# Altium PCB Linux-Capable-Businnes-Card.PcbDoc (part 2 of 4)
Units mil, origin at the board's own origin, x right, y up, seen from the top; angles counter-clockwise.
Board outline 3385.83 x 2125.98 mil, 4 copper layers (L1 (TOP), L2 (GND), L3 (PWR), L4 (BOTTOM)), stack 38.228 mil thick; 154 components, 143 nets, 726 pads, 351 vias.
Unrouted connection lines stored in the file: 1.
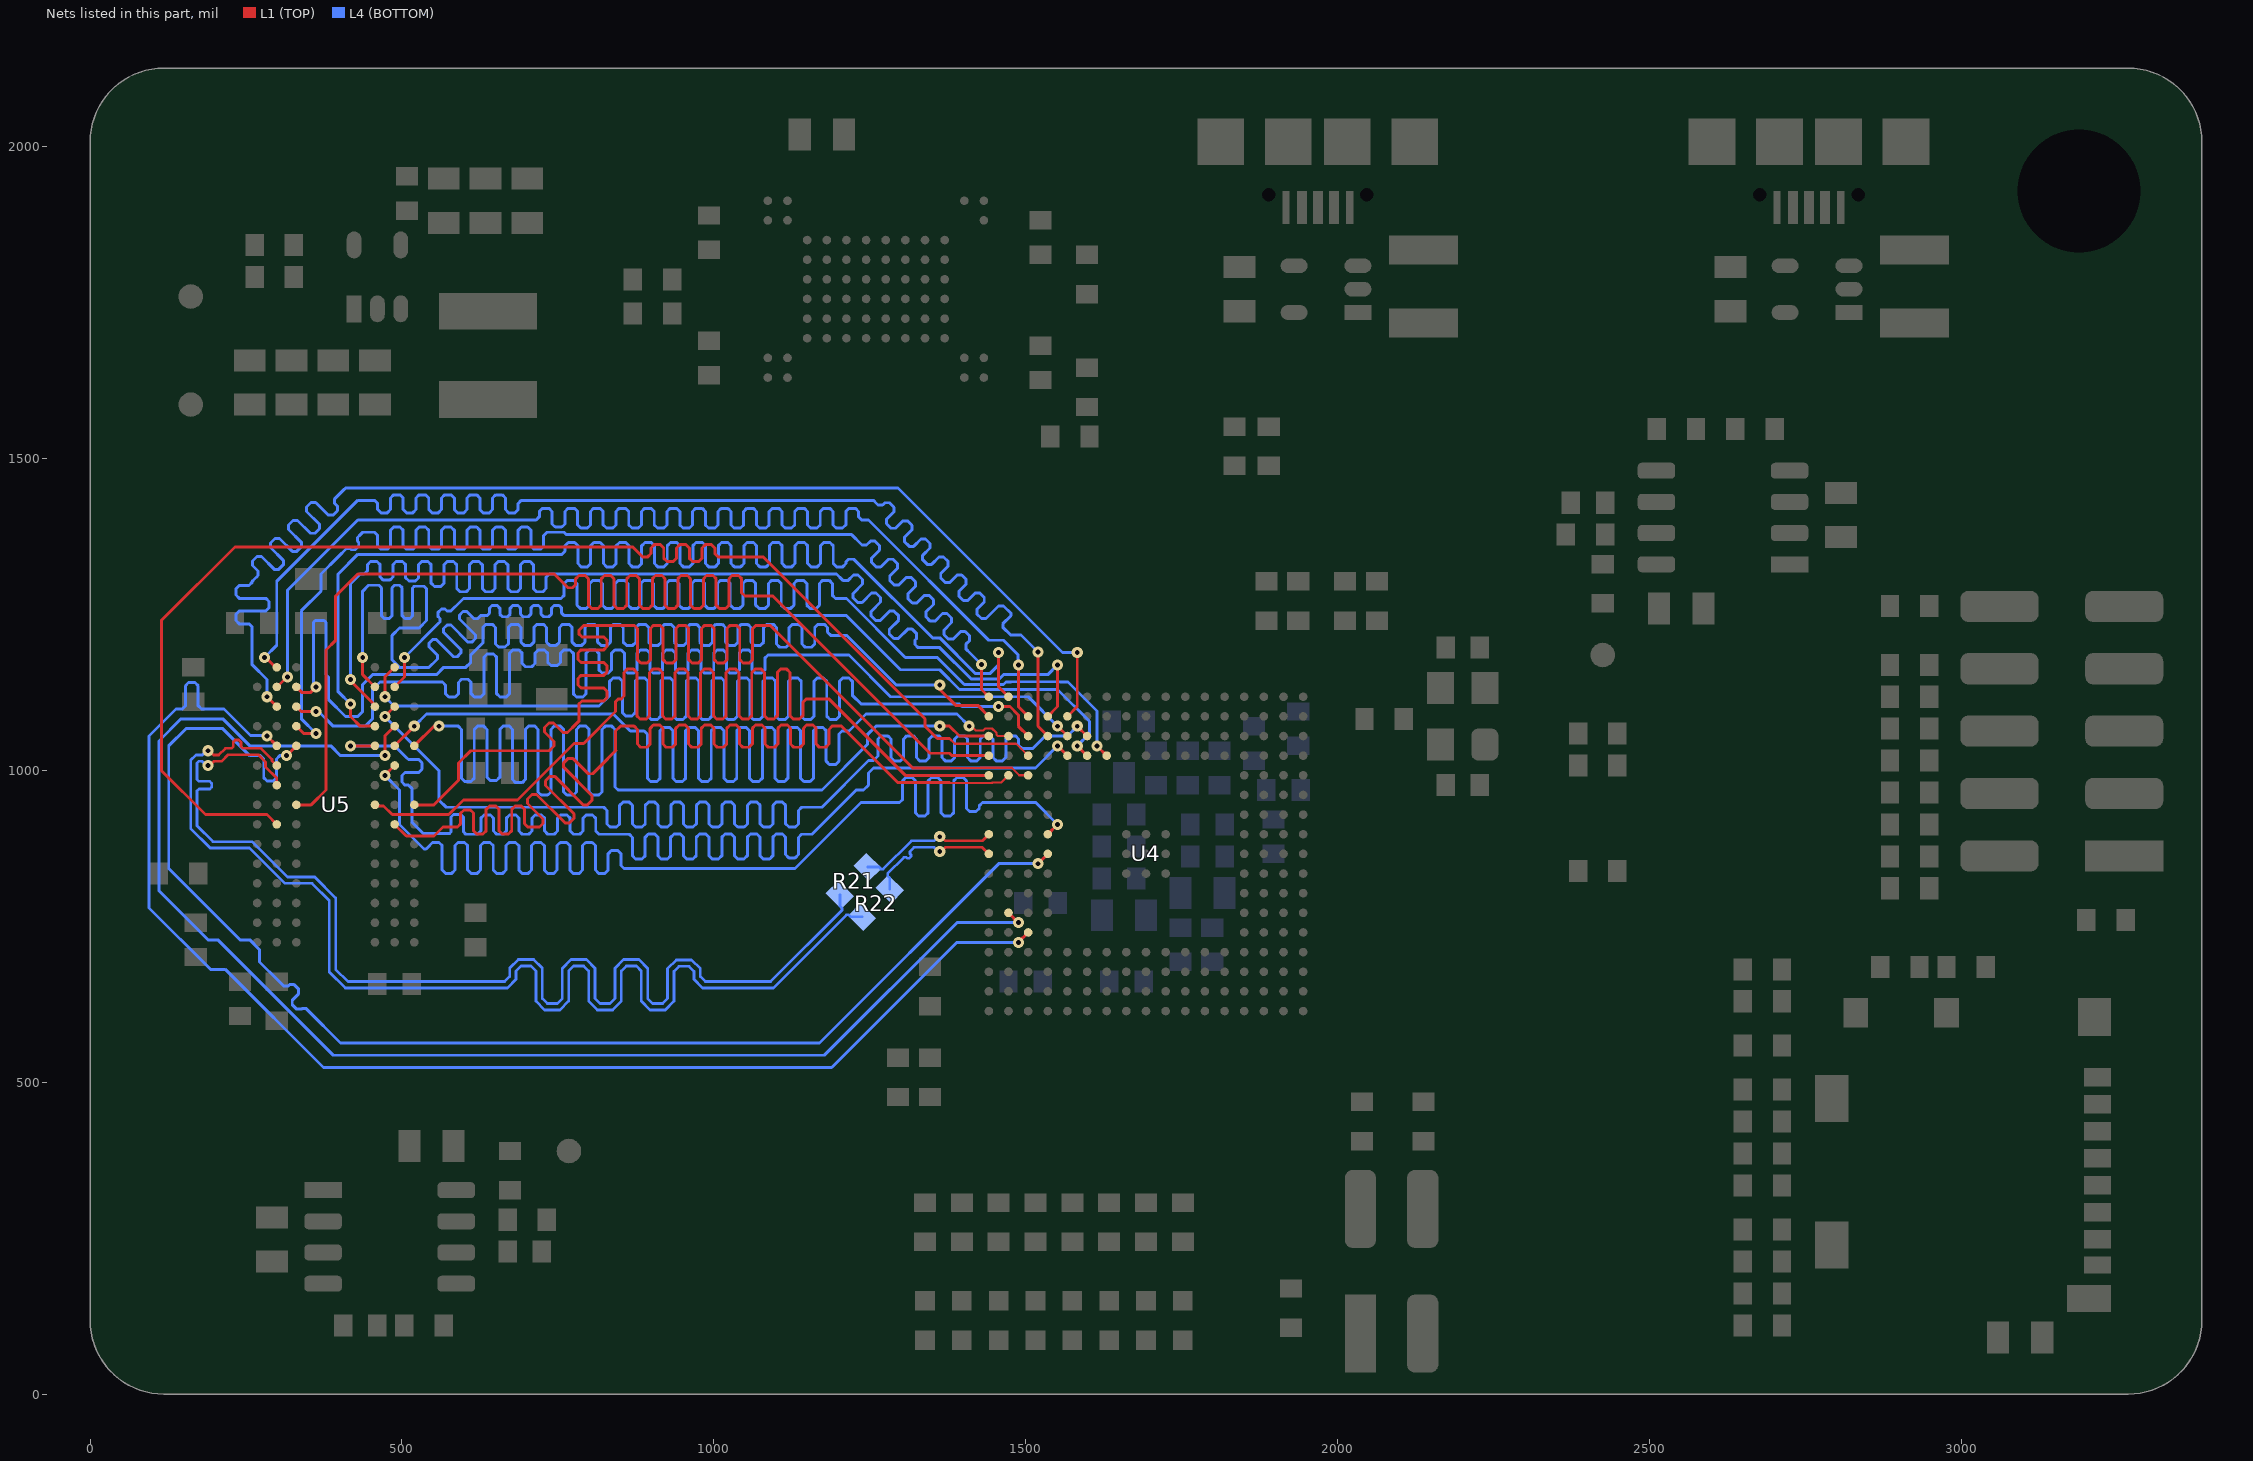
[diagram p4: the nets of this part, all layers, seen from the top]

## Via types
v1: diameter 17.72, hole 7.87, L1 (TOP) to L4 (BOTTOM), tented both sides, 280 vias
v2: diameter 25.59, hole 11.81, L1 (TOP) to L4 (BOTTOM), tented both sides, 71 vias

## Nets (pads, with @x,y where several pads share a name; then routed paths per layer and width w, separated by ;. In a path a pad name is that pad's centre, name@x,y a point inside that pad or via, vN(x,y) a via of type N, cw(c..) or ccw(c..) an arc to the next point about the centre after c; other vN are vias at no path point) (continued)
DRAM_A1: U4.B17 U5.M3 | length 2242.9
  L1 (TOP) w4.72: v1(417.32,1106.3) 417.32,1086.61 433.07,1070.87 U5.M3@456.69,1070.87 ; v1(1456.69,1188.98) 1456.69,1133.86 U4.B17@1472.44,1118.11
  L4 (BOTTOM) w4.72: v1(417.32,1106.3) 397.64,1125.98 397.64,1314.96 429.13,1346.46 754.05,1346.46 756.41,1346.46 761.53,1351.57 761.53,1360.18 766.65,1365.3 776.89,1365.3 782,1360.18 782,1331.57 787.12,1326.46 797.36,1326.46 802.48,1331.57 802.48,1360.18 807.59,1365.3 817.83,1365.3 822.95,1360.18 822.95,1331.57 828.07,1326.46 838.3,1326.46 843.42,1331.57 843.42,1360.18 848.54,1365.3 858.78,1365.3 863.89,1360.18 863.89,1331.57 869.01,1326.46 879.25,1326.46 884.37,1331.57 884.37,1360.18 889.48,1365.3 899.72,1365.3 904.84,1360.18 904.84,1331.57 909.96,1326.46 920.19,1326.46 925.31,1331.57 925.31,1360.18 930.43,1365.3 940.67,1365.3 945.78,1360.18 945.78,1331.57 950.9,1326.46 961.14,1326.46 966.26,1331.57 966.26,1360.18 971.37,1365.3 981.61,1365.3 986.73,1360.18 986.73,1331.57 991.85,1326.46 1002.08,1326.46 1007.2,1331.57 1007.2,1360.18 1012.32,1365.3 1022.56,1365.3 1027.67,1360.18 1027.67,1331.57 1032.79,1326.46 1043.03,1326.46 1048.15,1331.57 1048.15,1360.18 1053.26,1365.3 1063.5,1365.3 1068.62,1360.18 1068.62,1331.57 1073.74,1326.46 1083.97,1326.46 1089.09,1331.57 1089.09,1360.18 1094.21,1365.3 1104.44,1365.3 1109.56,1360.18 1109.56,1331.57 1114.68,1326.46 1124.92,1326.46 1130.04,1331.57 1130.04,1360.18 1135.15,1365.3 1145.39,1365.3 1150.51,1360.18 1150.51,1331.57 1155.63,1326.46 1165.86,1326.46 1170.98,1331.57 1170.98,1360.18 1176.1,1365.3 1186.33,1365.3 1191.45,1360.18 1191.45,1331.57 1196.57,1326.46 1206.81,1326.46 1211.92,1331.57 1211.92,1334.65 1215.86,1338.58 1224.41,1338.58 1350.39,1212.6 1362.2,1212.6 1419.69,1155.12 1442.52,1155.12 1456.69,1169.29 v1(1456.69,1188.98)
DRAM_A2: U4.A17 U5.M7 | length 2198.3
  L1 (TOP) w4.72: U5.M7@330.71,1070.87 342.52,1059.06 v1(362.2,1059.06) ; v1(1429.13,1169.88) 1429.13,1129.92 U4.A17@1440.94,1118.11
  L4 (BOTTOM) w4.72: v1(362.2,1059.06) 338.58,1082.68 338.58,1255.91 370.08,1287.4 370.08,1314.96 397.64,1342.52 411,1355.88 416.85,1355.88 418.93,1353.8 424.78,1353.8 430.63,1359.64 430.63,1365.49 428.54,1367.57 428.54,1373.42 433.07,1377.95 437.01,1381.89 455.91,1381.89 461.02,1376.77 461.02,1359.84 466.14,1354.72 476.38,1354.72 481.5,1359.84 481.5,1385.04 486.61,1390.16 496.85,1390.16 501.97,1385.04 501.97,1359.84 507.09,1354.72 517.32,1354.72 522.44,1359.84 522.44,1385.04 527.56,1390.16 537.8,1390.16 542.91,1385.04 542.91,1359.84 548.03,1354.72 558.27,1354.72 563.39,1359.84 563.39,1385.04 568.5,1390.16 578.74,1390.16 583.86,1385.04 583.86,1359.84 588.98,1354.72 599.21,1354.72 604.33,1359.84 604.33,1385.04 609.45,1390.16 619.69,1390.16 624.8,1385.04 624.8,1359.84 629.92,1354.72 640.16,1354.72 645.28,1359.84 645.28,1385.04 650.39,1390.16 660.63,1390.16 665.75,1385.04 665.75,1359.84 670.87,1354.72 681.1,1354.72 686.22,1359.84 686.22,1385.04 691.34,1390.16 701.57,1390.16 706.69,1385.04 706.69,1359.84 711.81,1354.72 722.05,1354.72 727.17,1359.84 727.17,1376.77 732.28,1381.89 743.55,1381.89 759.84,1381.89 763.78,1377.95 1221.06,1377.95 1235.94,1363.08 1237.61,1361.41 1244.85,1361.41 1250.98,1367.55 1258.22,1367.55 1265.46,1360.31 1265.46,1353.07 1253.06,1340.67 1253.06,1333.43 1260.3,1326.2 1267.54,1326.2 1279.94,1338.59 1287.17,1338.59 1294.41,1331.36 1294.41,1324.12 1282.01,1311.72 1282.01,1304.48 1289.25,1297.24 1296.49,1297.24 1308.89,1309.64 1316.13,1309.64 1323.36,1302.4 1323.36,1295.17 1310.97,1282.77 1310.97,1275.53 1318.2,1268.29 1325.44,1268.29 1337.84,1280.69 1345.08,1280.69 1352.32,1273.45 1352.32,1266.21 1339.92,1253.81 1339.92,1246.58 1347.16,1239.34 1354.4,1239.34 1366.79,1251.74 1374.03,1251.74 1381.27,1244.5 1381.27,1237.26 1368.87,1224.86 1368.87,1217.62 1376.11,1210.39 1383.35,1210.39 1395.75,1222.78 1402.98,1222.78 1410.22,1215.55 1410.22,1208.31 1404.08,1202.17 1404.08,1194.93 1411.71,1187.3 v1(1429.13,1169.88)
DRAM_A3: U4.F15 U5.N2 | length 2202.5
  L1 (TOP) w4.72: v1(472.44,1086.61) U5.N2@488.19,1102.36 ; v1(1582.68,1070.87) U4.F15@1598.42,1055.12
  L4 (BOTTOM) w4.72: v1(472.44,1086.61) 559.06,1000 559.06,952.76 570.87,940.94 800.66,940.94 823.49,940.94 828.61,935.83 828.61,914.25 833.73,909.13 843.96,909.13 849.08,914.25 849.08,944.02 854.2,949.13 864.44,949.13 869.55,944.02 869.55,914.25 874.67,909.13 884.91,909.13 890.03,914.25 890.03,944.02 895.14,949.13 905.38,949.13 910.5,944.02 910.5,914.25 915.62,909.13 925.85,909.13 930.97,914.25 930.97,944.02 936.09,949.13 946.32,949.13 951.44,944.02 951.44,914.25 956.56,909.13 966.8,909.13 971.92,914.25 971.92,944.02 977.03,949.13 987.27,949.13 992.39,944.02 992.39,914.25 997.51,909.13 1007.74,909.13 1012.86,914.25 1012.86,944.02 1017.98,949.13 1028.21,949.13 1033.33,944.02 1033.33,914.25 1038.45,909.13 1048.69,909.13 1053.8,914.25 1053.8,944.02 1058.92,949.13 1069.16,949.13 1074.28,944.02 1074.28,914.25 1079.4,909.13 1089.63,909.13 1094.75,914.25 1094.75,944.02 1099.87,949.13 1110.1,949.13 1115.22,944.02 1115.22,914.25 1120.34,909.13 1130.58,909.13 1135.69,914.25 1135.69,935.83 1140.81,940.94 1145.67,940.94 1173.23,940.94 1248.03,1015.75 1255.91,1015.75 1263.39,1023.23 1263.39,1050.32 1268.5,1055.43 1278.74,1055.43 1283.86,1050.32 1283.86,1020.55 1288.98,1015.43 1299.21,1015.43 1304.33,1020.55 1304.33,1050.32 1309.45,1055.43 1319.69,1055.43 1324.8,1050.32 1324.8,1020.55 1329.92,1015.43 1340.16,1015.43 1345.28,1020.55 1345.28,1050.32 1350.39,1055.43 1360.63,1055.43 1365.75,1050.32 1365.75,1020.55 1370.87,1015.43 1381.1,1015.43 1386.22,1020.55 1386.22,1050.32 1391.34,1055.43 1401.58,1055.43 1406.69,1050.32 1406.69,1020.55 1411.81,1015.43 1422.05,1015.43 1427.17,1020.55 1427.17,1050.32 1432.28,1055.43 1442.52,1055.43 1447.64,1050.32 1447.64,1020.55 1452.76,1015.43 1462.99,1015.43 1468.11,1020.55 1468.11,1050.32 1473.23,1055.43 1483.46,1055.43 1488.58,1050.32 1488.58,1040.55 1493.7,1035.43 1511.81,1035.43 1531.5,1055.12 1566.93,1055.12 v1(1582.68,1070.87)
DRAM_A4: U4.E16 U5.N8 | length 2213.4
  L1 (TOP) w4.72: v1(283.46,1118.11) U5.N8@299.21,1102.36 ; U4.E16@1566.93,1086.61 1582.68,1102.36 v1(1582.68,1188.98)
  L4 (BOTTOM) w4.72: v1(283.46,1118.11) 283.46,1145.67 259.84,1169.29 259.84,1227.56 259.84,1229.92 254.72,1235.04 239.05,1235.04 233.93,1240.16 233.93,1250.4 239.05,1255.51 281.57,1255.51 286.68,1260.63 286.68,1270.87 281.57,1275.99 239.05,1275.99 233.93,1281.1 233.93,1291.34 239.05,1296.46 254.72,1296.46 259.84,1301.58 259.84,1303.15 263.64,1306.94 267.38,1310.69 269.05,1312.36 269.05,1319.6 260.22,1328.43 260.22,1335.67 267.46,1342.91 274.7,1342.91 295.21,1322.39 302.45,1322.39 309.69,1329.63 309.69,1336.87 289.17,1357.38 289.17,1364.62 296.41,1371.86 303.65,1371.86 324.16,1351.35 331.4,1351.35 338.64,1358.58 338.64,1365.82 318.12,1386.33 318.12,1393.57 325.36,1400.81 332.6,1400.81 353.11,1380.3 360.35,1380.3 367.59,1387.54 367.59,1394.77 347.08,1415.29 347.08,1422.52 354.32,1429.76 361.55,1429.76 382.07,1409.25 389.3,1409.25 396.54,1416.49 396.54,1423.73 392.1,1428.17 392.1,1435.41 407.48,1450.79 409.45,1452.76 1295.28,1452.76 1559.06,1188.98 v1(1582.68,1188.98)
DRAM_A5: U4.D16 U5.N3 | length 2195.4
  L1 (TOP) w4.72: v1(417.32,1145.67) 417.32,1143.7 U5.N3@456.69,1104.33 ; U4.D16@1535.43,1086.61 1551.18,1102.36 v1(1551.18,1169.29)
  L4 (BOTTOM) w4.72: v1(417.32,1145.67) 417.32,1299.21 433.07,1314.96 437.01,1314.96 439.37,1314.96 444.49,1320.08 444.49,1329.84 449.61,1334.96 459.84,1334.96 464.96,1329.84 464.96,1310.09 470.08,1304.97 480.32,1304.97 485.43,1310.09 485.43,1329.84 490.55,1334.96 500.79,1334.96 505.91,1329.84 505.91,1308.66 511.02,1303.54 521.26,1303.54 526.38,1308.66 526.38,1329.84 531.5,1334.96 541.73,1334.96 546.85,1329.84 546.85,1299.98 551.97,1294.86 562.21,1294.86 567.32,1299.98 567.32,1329.84 572.44,1334.96 582.68,1334.96 587.8,1329.84 587.8,1291.57 592.91,1286.45 603.15,1286.45 608.27,1291.57 608.27,1329.84 613.39,1334.96 623.62,1334.96 628.74,1329.84 628.74,1291.57 633.86,1286.45 644.09,1286.45 649.21,1291.57 649.21,1329.84 654.33,1334.96 664.57,1334.96 669.69,1329.84 669.69,1291.57 674.8,1286.45 685.04,1286.45 690.16,1291.57 690.16,1329.84 695.28,1334.96 705.51,1334.96 710.63,1329.84 710.63,1291.57 715.75,1286.45 725.98,1286.45 731.1,1291.57 731.1,1309.84 736.22,1314.96 747.77,1314.96 1196.85,1314.96 1205.95,1305.87 1207.62,1304.19 1214.85,1304.19 1223.93,1313.27 1231.17,1313.27 1238.41,1306.04 1238.41,1298.8 1223.37,1283.75 1223.37,1276.52 1230.6,1269.28 1237.84,1269.28 1252.88,1284.32 1260.12,1284.32 1267.36,1277.08 1267.36,1269.84 1252.32,1254.8 1252.32,1247.56 1259.56,1240.33 1266.79,1240.33 1281.84,1255.37 1289.08,1255.37 1296.31,1248.13 1296.31,1240.89 1281.27,1225.85 1281.27,1218.61 1288.51,1211.37 1295.75,1211.37 1310.79,1226.42 1318.03,1226.42 1325.27,1219.18 1325.27,1211.94 1322.53,1209.21 1322.53,1201.97 1327.65,1196.85 1334.98,1196.85 1362.2,1196.85 1412.2,1146.85 1457.87,1146.85 1464.57,1153.54 1535.43,1153.54 v1(1551.18,1169.29)
DRAM_A6: U4.E15 U5.N7 | length 2258.2
  L1 (TOP) w4.72: U5.N7@330.71,1102.36 338.58,1094.49 v1(362.2,1094.49) ; v1(1551.18,1070.87) U4.E15@1566.93,1055.12
  L4 (BOTTOM) w4.72: v1(362.2,1094.49) 366.14,1094.49 389.76,1070.87 440.94,1070.87 452.76,1082.68 452.76,1129.92 464.57,1141.73 541.98,1141.73 564.81,1141.73 569.93,1136.61 569.93,1122.91 575.05,1117.8 585.29,1117.8 590.41,1122.91 590.41,1141.08 595.52,1146.2 605.76,1146.2 610.88,1141.08 610.88,1122.91 616,1117.8 626.23,1117.8 631.35,1122.91 631.35,1181.47 636.47,1186.59 646.7,1186.59 651.82,1181.47 651.82,1122.91 656.94,1117.8 667.18,1117.8 672.29,1122.91 672.29,1187.85 677.41,1192.97 687.65,1192.97 692.77,1187.85 692.77,1171.32 697.89,1166.21 708.12,1166.21 713.24,1171.32 713.24,1187.85 718.36,1192.97 728.59,1192.97 733.71,1187.85 733.71,1173.19 738.83,1168.07 749.07,1168.07 754.18,1173.19 754.18,1187.85 759.3,1192.97 769.54,1192.97 774.66,1187.85 774.66,1122.91 779.78,1117.8 790.01,1117.8 795.13,1122.91 795.13,1187.85 800.25,1192.97 810.48,1192.97 815.6,1187.85 815.6,1161.32 820.72,1156.2 830.96,1156.2 836.07,1161.32 836.07,1187.85 841.19,1192.97 851.43,1192.97 856.55,1187.85 856.55,1161.32 861.66,1156.2 871.9,1156.2 877.02,1161.32 877.02,1187.85 882.14,1192.97 892.37,1192.97 897.49,1187.85 897.49,1161.32 902.61,1156.2 912.85,1156.2 917.96,1161.32 917.96,1187.85 923.08,1192.97 933.32,1192.97 938.44,1187.85 938.44,1161.32 943.55,1156.2 953.79,1156.2 958.91,1161.32 958.91,1187.85 964.03,1192.97 974.26,1192.97 979.38,1187.85 979.38,1161.32 984.5,1156.2 994.74,1156.2 999.85,1161.32 999.85,1187.85 1004.97,1192.97 1015.21,1192.97 1020.33,1187.85 1020.33,1161.32 1025.44,1156.2 1035.68,1156.2 1040.8,1161.32 1040.8,1187.85 1045.92,1192.97 1056.15,1192.97 1061.27,1187.85 1061.27,1161.32 1066.39,1156.2 1076.62,1156.2 1081.74,1161.32 1081.74,1179.92 1086.86,1185.04 1111.06,1185.04 1216.54,1185.04 1283.46,1118.11 1503.94,1118.11 v1(1551.18,1070.87)
DRAM_A7: U4.G14 U5.P2 | length 2197.7
  L1 (TOP) w4.72: U5.P2@488.19,1133.86 503.94,1149.61 v1(503.94,1181.1) ; v1@1616.14,1037.4 U4.G14@1629.92,1023.62
  L4 (BOTTOM) w4.72: v1(503.94,1181.1) 559.06,1236.22 560.73,1237.89 560.73,1243.74 557.42,1247.04 557.42,1252.89 563.27,1258.73 569.12,1258.73 572.42,1255.43 578.26,1255.43 594.49,1271.65 598.43,1275.59 752.59,1275.59 754.95,1275.59 760.07,1280.71 760.07,1299.65 765.18,1304.77 775.42,1304.77 780.54,1299.65 780.54,1264.97 785.66,1259.86 795.89,1259.86 801.01,1264.97 801.01,1299.65 806.13,1304.77 816.37,1304.77 821.48,1299.65 821.48,1264.97 826.6,1259.86 836.84,1259.86 841.96,1264.97 841.96,1299.65 847.07,1304.77 857.31,1304.77 862.43,1299.65 862.43,1264.97 867.55,1259.86 877.78,1259.86 882.9,1264.97 882.9,1299.65 888.02,1304.77 898.26,1304.77 903.37,1299.65 903.37,1264.97 908.49,1259.86 918.73,1259.86 923.85,1264.97 923.85,1299.65 928.96,1304.77 939.2,1304.77 944.32,1299.65 944.32,1264.97 949.44,1259.86 959.67,1259.86 964.79,1264.97 964.79,1299.65 969.91,1304.77 980.15,1304.77 985.26,1299.65 985.26,1264.97 990.38,1259.86 1000.62,1259.86 1005.74,1264.97 1005.74,1299.65 1010.85,1304.77 1021.09,1304.77 1026.21,1299.65 1026.21,1264.97 1031.33,1259.86 1041.56,1259.86 1046.68,1264.97 1046.68,1299.65 1051.8,1304.77 1062.03,1304.77 1067.15,1299.65 1067.15,1264.97 1072.27,1259.86 1082.51,1259.86 1087.63,1264.97 1087.63,1299.65 1092.74,1304.77 1102.98,1304.77 1108.1,1299.65 1108.1,1264.97 1113.22,1259.86 1123.45,1259.86 1128.57,1264.97 1128.57,1299.65 1133.69,1304.77 1143.92,1304.77 1149.04,1299.65 1149.04,1264.97 1154.16,1259.86 1164.4,1259.86 1169.51,1264.97 1169.51,1299.65 1174.63,1304.77 1184.87,1304.77 1189.99,1299.65 1189.99,1280.71 1195.11,1275.59 1199.24,1275.59 1212.6,1275.59 1307.09,1181.1 1358.27,1181.1 1401.57,1137.8 1464.57,1137.8 1468.5,1141.73 1476.5,1141.73 1476.89,1142.13 1554.61,1142.13 1555,1141.73 1567.72,1141.73 1614.17,1095.28 v1(1614.17,1039.37)
DRAM_A8: U4.C16 U5.P8 | length 2213.3
  L1 (TOP) w4.72: U5.P8@299.8,1133.86 315.55,1149.61 v1(316.13,1149.61) ; v1(1488.19,1169.29) 1488.19,1102.36 U4.C16@1503.94,1086.61
  L4 (BOTTOM) w4.72: v1(316.13,1149.61) 316.13,1288.57 429.13,1401.57 712.77,1401.57 715.13,1401.57 720.25,1406.69 720.25,1415.12 725.36,1420.24 735.6,1420.24 740.72,1415.12 740.72,1395.28 745.84,1390.16 756.07,1390.16 761.19,1395.28 761.19,1415.12 766.31,1420.24 776.55,1420.24 781.66,1415.12 781.66,1393.7 786.78,1388.58 797.02,1388.58 802.14,1393.7 802.14,1415.12 807.25,1420.24 817.49,1420.24 822.61,1415.12 822.61,1393.7 827.73,1388.58 837.96,1388.58 843.08,1393.7 843.08,1415.12 848.2,1420.24 858.43,1420.24 863.55,1415.12 863.55,1393.7 868.67,1388.58 878.91,1388.58 884.03,1393.7 884.03,1415.12 889.14,1420.24 899.38,1420.24 904.5,1415.12 904.5,1393.7 909.62,1388.58 919.85,1388.58 924.97,1393.7 924.97,1415.12 930.09,1420.24 940.32,1420.24 945.44,1415.12 945.44,1393.7 950.56,1388.58 960.8,1388.58 965.91,1393.7 965.91,1415.12 971.03,1420.24 981.27,1420.24 986.39,1415.12 986.39,1393.7 991.51,1388.58 1001.74,1388.58 1006.86,1393.7 1006.86,1415.12 1011.98,1420.24 1022.21,1420.24 1027.33,1415.12 1027.33,1393.7 1032.45,1388.58 1042.69,1388.58 1047.8,1393.7 1047.8,1415.12 1052.92,1420.24 1063.16,1420.24 1068.28,1415.12 1068.28,1393.7 1073.39,1388.58 1083.63,1388.58 1088.75,1393.7 1088.75,1415.12 1093.87,1420.24 1104.1,1420.24 1109.22,1415.12 1109.22,1393.7 1114.34,1388.58 1124.58,1388.58 1129.69,1393.7 1129.69,1415.12 1134.81,1420.24 1145.05,1420.24 1150.17,1415.12 1150.17,1393.7 1155.28,1388.58 1165.52,1388.58 1170.64,1393.7 1170.64,1415.12 1175.76,1420.24 1185.99,1420.24 1191.11,1415.12 1191.11,1393.7 1196.23,1388.58 1206.47,1388.58 1211.58,1393.7 1211.58,1415.12 1216.7,1420.24 1226.94,1420.24 1232.06,1415.12 1232.06,1406.69 1237.17,1401.57 1248.03,1401.57 1440.94,1208.66 1464.57,1208.66 1487.99,1185.24 1487.99,1169.49 v1(1488.19,1169.29)
DRAM_A9: U4.F14 U5.P3 | length 2224.7
  L1 (TOP) w4.72: v1(437.01,1181.1) 437.01,1153.54 U5.P3@456.69,1133.86 ; v1(1582.68,1039.37) U4.F14@1598.42,1023.62
  L4 (BOTTOM) w4.72: v1(437.01,1181.1) 437.01,1287.4 446.51,1296.9 463.14,1296.9 467.27,1292.77 467.27,1247.91 471.4,1243.78 479.67,1243.78 483.81,1247.91 483.81,1292.77 487.94,1296.9 496.21,1296.9 500.34,1292.77 500.34,1247.91 504.48,1243.78 512.74,1243.78 516.88,1247.91 516.88,1292.47 519.69,1295.28 535.43,1295.28 539.37,1291.34 539.37,1240.16 527.56,1228.35 496.06,1228.35 484.25,1216.54 484.25,1177.17 496.06,1165.35 543.31,1165.35 555.12,1177.17 556.79,1178.84 556.79,1184.68 543.34,1198.13 543.34,1203.98 549.19,1209.82 555.03,1209.82 582.62,1182.23 588.47,1182.23 594.32,1188.08 594.32,1193.92 566.72,1221.52 566.72,1227.36 572.57,1233.21 578.42,1233.21 606.01,1205.62 611.85,1205.62 617.7,1211.46 617.7,1217.31 592.11,1242.9 592.11,1248.74 597.96,1254.59 603.8,1254.59 615.25,1243.14 621.1,1243.14 625.79,1247.83 625.98,1248.03 633.86,1248.03 636.22,1248.03 640.35,1252.17 640.35,1260.09 644.49,1264.23 652.76,1264.23 656.89,1260.09 656.89,1250.49 661.02,1246.36 669.29,1246.36 673.43,1250.49 673.43,1260.09 677.56,1264.23 685.83,1264.23 689.96,1260.09 689.96,1250.49 694.09,1246.36 702.36,1246.36 706.5,1250.49 706.5,1260.09 710.63,1264.23 718.9,1264.23 723.03,1260.09 723.03,1250.49 727.17,1246.36 735.43,1246.36 739.57,1250.49 739.57,1260.09 743.7,1264.23 751.97,1264.23 756.1,1260.09 756.1,1252.17 760.24,1248.03 768.19,1248.03 1212.6,1248.03 1299.21,1161.42 1362.2,1161.42 1393.7,1129.92 1397.76,1129.92 1398.15,1129.53 1475.98,1129.53 1476.38,1129.92 1551.18,1129.92 1602.36,1078.74 1602.36,1059.06 v1(1582.68,1039.37)
DRAM_A10: U4.B6 U5.M2 | length 2292.8
  L1 (TOP) w4.72: v1(472.44,1023.62) 472.44,1055.12 U5.M2@488.19,1070.87 ; U4.B6@1472.44,771.65 v1(1488.19,755.9)
  L4 (BOTTOM) w4.72: v1(472.44,1023.62) 401.57,1023.62 385.83,1039.37 255.91,1039.37 212.6,1082.68 145.67,1082.68 110.24,1047.24 110.24,807.09 188.98,728.35 204.72,728.35 389.76,543.31 1177.17,543.31 1389.76,755.9 v1(1488.19,755.9)
DRAM_A11: U4.A16 U5.P7 | length 2275.6
  L1 (TOP) w4.72: U5.P7@330.71,1133.86 339.96,1124.61 352.95,1124.61 v1(362.2,1133.86) ; v1(1362.2,1136.81) 1362.2,1129.92 1387.8,1104.33 1423.23,1104.33 U4.A16@1440.94,1086.61
  L4 (BOTTOM) w4.72: v1(362.2,1133.86) 362.2,1137.37 358.27,1141.31 358.27,1237.39 361.04,1240.16 375.19,1240.16 377.95,1237.39 377.95,1153.54 381.89,1149.61 381.89,1114.17 409.45,1086.61 429.13,1086.61 437.01,1094.49 437.01,1137.8 452.76,1153.54 555.12,1153.54 566.93,1165.35 602.36,1165.35 610.24,1173.23 610.24,1185.04 629.53,1204.33 629.53,1229.08 634.65,1234.19 644.88,1234.19 650,1229.08 650,1202.84 655.12,1197.72 665.35,1197.72 670.47,1202.84 670.47,1229.08 675.59,1234.19 685.83,1234.19 690.95,1229.08 690.95,1205.67 696.06,1200.55 706.3,1200.55 711.42,1205.67 711.42,1229.08 716.54,1234.19 726.77,1234.19 731.89,1229.08 731.89,1205.67 737.01,1200.55 747.24,1200.55 752.36,1205.67 752.36,1229.08 757.48,1234.19 767.72,1234.19 772.83,1229.08 772.83,1205.67 777.95,1200.55 788.19,1200.55 793.31,1205.67 793.31,1229.08 798.43,1234.19 808.66,1234.19 813.78,1229.08 813.78,1205.67 818.9,1200.55 829.13,1200.55 834.25,1205.67 834.25,1229.08 839.37,1234.19 849.61,1234.19 854.72,1229.08 854.72,1205.67 859.84,1200.55 870.08,1200.55 875.2,1205.67 875.2,1229.08 880.32,1234.19 890.55,1234.19 895.67,1229.08 895.67,1205.67 900.79,1200.55 911.02,1200.55 916.14,1205.67 916.14,1229.08 921.26,1234.19 931.5,1234.19 936.61,1229.08 936.61,1205.67 941.73,1200.55 951.97,1200.55 957.09,1205.67 957.09,1229.08 962.2,1234.19 972.44,1234.19 977.56,1229.08 977.56,1205.67 982.68,1200.55 992.91,1200.55 998.03,1205.67 998.03,1229.08 1003.15,1234.19 1013.39,1234.19 1018.5,1229.08 1018.5,1205.67 1023.62,1200.55 1033.86,1200.55 1038.98,1205.67 1038.98,1229.08 1044.09,1234.19 1054.33,1234.19 1059.45,1229.08 1059.45,1205.67 1064.57,1200.55 1074.8,1200.55 1079.92,1205.67 1079.92,1229.08 1085.04,1234.19 1095.28,1234.19 1100.39,1229.08 1100.39,1202.63 1105.51,1197.52 1115.75,1197.52 1120.87,1202.63 1120.87,1229.08 1125.98,1234.19 1136.22,1234.19 1141.34,1229.08 1141.34,1202.63 1146.46,1197.52 1156.69,1197.52 1161.81,1202.63 1161.81,1229.08 1166.93,1234.19 1177.16,1234.19 1182.28,1229.08 1182.28,1221.65 1187.4,1216.54 1212.72,1216.54 1292.44,1136.81 v1(1362.2,1136.81)
DRAM_A12: U4.C15 U5.R2 | length 2264.7
  L1 (TOP) w4.72: v1(472.44,1118.11) 472.44,1149.61 U5.R2@488.19,1165.35 ; v1(1456.69,1102.36) 1474.79,1102.36 1488.19,1088.96 1488.19,1070.87 U4.C15@1503.94,1055.12
  L4 (BOTTOM) w4.72: v1(472.44,1118.11) 487.2,1103.35 815.94,1103.35 833.03,1120.43 833.03,1143.08 838.15,1148.2 848.38,1148.2 853.5,1143.08 853.5,1092.44 858.62,1087.33 868.86,1087.33 873.97,1092.44 873.97,1143.08 879.09,1148.2 889.33,1148.2 894.45,1143.08 894.45,1086.74 899.56,1081.62 909.8,1081.62 914.92,1086.74 914.92,1143.08 920.04,1148.2 930.27,1148.2 935.39,1143.08 935.39,1086.74 940.51,1081.62 950.74,1081.62 955.86,1086.74 955.86,1143.08 960.98,1148.2 971.22,1148.2 976.34,1143.08 976.34,1086.74 981.45,1081.62 991.69,1081.62 996.81,1086.74 996.81,1143.08 1001.93,1148.2 1012.16,1148.2 1017.28,1143.08 1017.28,1086.74 1022.4,1081.62 1032.63,1081.62 1037.75,1086.74 1037.75,1143.08 1042.87,1148.2 1053.11,1148.2 1058.23,1143.08 1058.23,1086.74 1063.34,1081.62 1073.58,1081.62 1078.7,1086.74 1078.7,1143.08 1083.82,1148.2 1094.05,1148.2 1099.17,1143.08 1099.17,1086.74 1104.29,1081.62 1114.52,1081.62 1119.64,1086.74 1119.64,1143.08 1124.76,1148.2 1135,1148.2 1140.11,1143.08 1140.11,1086.74 1145.23,1081.62 1155.47,1081.62 1160.59,1086.74 1160.59,1143.08 1165.71,1148.2 1175.94,1148.2 1181.06,1143.08 1181.06,1086.74 1186.18,1081.62 1196.41,1081.62 1201.53,1086.74 1201.53,1143.08 1206.65,1148.2 1216.89,1148.2 1222,1143.08 1222,1120.52 1236.22,1106.3 1393.7,1106.3 1397.64,1102.36 1421.26,1102.36 v1(1456.69,1102.36)
DRAM_A13: U4.D15 U5.R8 | length 2223.1
  L1 (TOP) w4.72: v1(279.53,1181.1) 281.5,1181.1 297.24,1165.35 U5.R8@299.21,1165.35 ; v1(1519.69,1189.96) 1519.69,1070.87 U4.D15@1535.43,1055.12
  L4 (BOTTOM) w4.72: v1(279.53,1181.1) 299.21,1200.79 299.21,1303.15 429.13,1433.07 455.91,1433.07 461.02,1427.95 461.02,1418.19 466.14,1413.07 476.38,1413.07 481.5,1418.19 481.5,1436.82 486.61,1441.94 496.85,1441.94 501.97,1436.82 501.97,1418.19 507.09,1413.07 517.32,1413.07 522.44,1418.19 522.44,1436.82 527.56,1441.94 537.8,1441.94 542.91,1436.82 542.91,1418.19 548.03,1413.07 558.27,1413.07 563.39,1418.19 563.39,1436.82 568.5,1441.94 578.74,1441.94 583.86,1436.82 583.86,1418.19 588.98,1413.07 599.21,1413.07 604.33,1418.19 604.33,1436.82 609.45,1441.94 619.69,1441.94 624.8,1436.82 624.8,1418.19 629.92,1413.07 640.16,1413.07 645.28,1418.19 645.28,1436.82 650.39,1441.94 660.63,1441.94 665.75,1436.82 665.75,1418.19 670.87,1413.07 681.1,1413.07 686.22,1418.19 686.22,1427.95 691.34,1433.07 1255.91,1433.07 1261.81,1427.17 1263.48,1425.49 1270.72,1425.49 1274.34,1429.12 1281.58,1429.12 1288.82,1421.88 1288.82,1414.64 1276.96,1402.78 1276.96,1395.54 1284.2,1388.31 1291.44,1388.31 1303.3,1400.17 1310.53,1400.17 1317.77,1392.93 1317.77,1385.69 1305.91,1373.83 1305.91,1366.59 1313.15,1359.35 1320.39,1359.35 1332.25,1371.21 1339.49,1371.21 1346.72,1363.98 1346.72,1356.74 1334.86,1344.88 1334.86,1337.64 1342.1,1330.4 1349.34,1330.4 1361.2,1342.26 1368.44,1342.26 1375.68,1335.02 1375.68,1327.79 1363.82,1315.92 1363.82,1308.69 1371.05,1301.45 1378.29,1301.45 1390.15,1313.31 1397.39,1313.31 1404.63,1306.07 1404.63,1298.83 1392.77,1286.97 1392.77,1279.73 1400.01,1272.5 1407.24,1272.5 1419.11,1284.36 1426.34,1284.36 1433.58,1277.12 1433.58,1269.88 1421.72,1258.02 1421.72,1250.78 1428.96,1243.54 1436.2,1243.54 1456.43,1263.78 1464.57,1263.78 1476.39,1251.96 1476.39,1248.04 1463.37,1235.03 1463.37,1229.54 1475.89,1217.03 1492.62,1217.03 v1(1519.69,1189.96)
DRAM_BA0: U4.B15 U5.L2 | length 2269
  L1 (TOP) w3.54: v1(1409.45,1070.87) 1413.28,1070.87 1420.37,1063.78 1431.41,1063.78 1434.96,1067.32 1446,1067.32 1453.15,1060.17 1453.15,1057.19 1455.22,1055.12 U4.B15@1472.44,1055.12
  L1 (TOP) w4.72: U5.L2@488.19,1039.37 v1(519.69,1070.87)
  L4 (BOTTOM) w4.72: v1(519.69,1070.87) 539.37,1090.55 838.58,1090.55 858.27,1070.87 866.14,1062.99 888.34,1063.01 893.46,1057.9 893.46,987.47 898.58,982.35 908.81,982.35 913.93,987.47 913.93,1063.69 919.05,1068.8 929.29,1068.8 934.4,1063.69 934.4,987.47 939.52,982.35 949.76,982.35 954.88,987.47 954.88,1063.69 959.99,1068.8 970.23,1068.8 975.35,1063.69 975.35,987.47 980.47,982.35 990.7,982.35 995.82,987.47 995.82,1063.69 1000.94,1068.8 1011.18,1068.8 1016.29,1063.69 1016.29,987.47 1021.41,982.35 1031.65,982.35 1036.77,987.47 1036.77,1063.69 1041.88,1068.8 1052.12,1068.8 1057.24,1063.69 1057.24,987.47 1062.36,982.35 1072.59,982.35 1077.71,987.47 1077.71,1063.69 1082.83,1068.8 1093.06,1068.8 1098.18,1063.69 1098.18,987.47 1103.3,982.35 1113.54,982.35 1118.66,987.47 1118.66,1063.69 1123.77,1068.8 1134.01,1068.8 1139.13,1063.69 1139.13,987.47 1144.25,982.35 1154.48,982.35 1159.6,987.47 1159.6,1063.69 1164.72,1068.8 1174.95,1068.8 1180.07,1063.69 1180.07,1014.74 1185.19,1009.63 1195.43,1009.63 1200.54,1014.74 1200.54,1058.22 1205.66,1063.34 1214.53,1063.35 1216.89,1063.35 1244.09,1090.55 1389.76,1090.55 v1(1409.45,1070.87)
DRAM_BA1: U4.E14 U5.L3 | length 2205
  L1 (TOP) w4.72: v1(417.32,1039.37) U5.L3@456.69,1039.37 ; v1(1551.18,1039.37) U4.E14@1566.93,1023.62
  L4 (BOTTOM) w4.72: v1(417.32,1039.37) 488.19,1039.37 507.87,1019.69 510.24,1017.32 526.94,1017.32 532.06,1012.2 532.06,1001.97 526.94,996.85 505,996.85 499.88,991.73 499.88,981.5 505,976.38 510.63,976.38 515.75,971.26 515.75,964.57 515.75,917.32 534.45,898.62 575.97,898.62 578.74,901.39 578.74,925.2 582.68,929.13 594.49,929.13 598.43,925.2 598.43,901.57 602.36,897.64 621.26,897.64 626.38,902.76 626.38,923.3 631.5,928.42 641.73,928.42 646.85,923.3 646.85,902.75 651.97,897.63 662.2,897.63 667.32,902.75 667.32,923.3 672.44,928.42 682.68,928.42 687.8,923.3 687.8,902.75 692.91,897.63 703.15,897.63 708.27,902.75 708.27,923.3 713.39,928.42 723.62,928.42 728.74,923.3 728.74,902.75 733.86,897.63 744.09,897.63 749.21,902.75 749.21,923.3 754.33,928.42 764.57,928.42 769.68,923.3 769.68,902.75 774.8,897.63 785.04,897.63 790.16,902.75 790.16,923.3 795.28,928.42 805.51,928.42 810.63,923.3 810.63,902.76 815.75,897.64 841.47,897.64 864.3,897.64 869.42,892.52 869.42,863.07 874.54,857.95 884.78,857.95 889.9,863.07 889.9,892.83 895.01,897.95 905.25,897.95 910.37,892.83 910.37,863.07 915.49,857.95 925.72,857.95 930.84,863.07 930.84,892.83 935.96,897.95 946.19,897.95 951.31,892.83 951.31,863.07 956.43,857.95 966.67,857.95 971.78,863.07 971.78,892.83 976.9,897.95 987.14,897.95 992.26,892.83 992.26,863.07 997.38,857.95 1007.61,857.95 1012.73,863.07 1012.73,892.83 1017.85,897.95 1028.08,897.95 1033.2,892.83 1033.2,863.07 1038.32,857.95 1048.56,857.95 1053.67,863.07 1053.67,892.83 1058.79,897.95 1069.03,897.95 1074.15,892.83 1074.15,863.07 1079.27,857.95 1089.5,857.95 1094.62,863.07 1094.62,892.83 1099.74,897.95 1109.97,897.95 1115.09,892.83 1115.09,864.97 1120.21,859.85 1130.45,859.85 1135.56,864.97 1135.56,892.52 1140.68,897.64 1153.54,897.64 1157.48,897.64 1228.35,968.5 1240.16,968.5 1248.03,976.38 1248.03,996.06 1255.91,1003.94 1515.75,1003.94 v1(1551.18,1039.37)
DRAM_BA2: U4.A15 U5.L1 | length 2211.8
  L1 (TOP) w4.72: U5.L1@519.69,1039.37 551.18,1070.87 v1(559.06,1070.87) ; v1(1362.2,1070.87) 1377.95,1070.87 1393.7,1055.12 U4.A15@1440.94,1055.12
  L4 (BOTTOM) w4.72: v1(559.06,1070.87) 567.45,1070.87 590.28,1070.87 595.4,1065.75 595.4,987.34 600.52,982.23 610.76,982.23 615.87,987.34 615.87,1065.75 620.99,1070.87 631.23,1070.87 636.35,1065.75 636.35,988.92 641.46,983.8 651.7,983.8 656.82,988.92 656.82,1065.75 661.94,1070.87 672.17,1070.87 677.29,1065.75 677.29,985.52 682.41,980.4 692.65,980.4 697.76,985.52 697.76,1065.75 702.88,1070.87 713.12,1070.87 718.24,1065.75 718.24,965.55 723.35,960.43 733.59,960.43 738.71,965.55 738.71,1065.75 743.83,1070.87 754.06,1070.87 759.18,1065.75 759.18,965.55 764.3,960.43 774.53,960.43 779.65,965.55 779.65,1065.75 784.77,1070.87 795.01,1070.87 800.13,1065.75 800.13,965.55 805.24,960.43 815.48,960.43 820.6,965.55 820.6,1065.75 825.72,1070.87 832.06,1070.87 836.38,1070.87 841.49,1065.75 841.49,973.61 846.61,968.49 1173.21,968.49 1246.06,1041.34 1246.06,1057.09 1259.84,1070.87 v1(1362.2,1070.87)
DRAM_CAS: U4.D9 U5.L7 | length 2200.5
  L1 (TOP) w4.72: v1(314.96,1023.62) U5.L7@330.71,1039.37 ; v1(1519.68,850.39) U4.D9@1535.43,866.14
  L4 (BOTTOM) w4.72: v1(314.96,1023.62) 311.77,1023.62 303.96,1023.62 298.84,1018.5 298.84,988.23 293.72,983.12 283.49,983.12 278.37,988.23 278.37,1018.5 273.25,1023.62 256.02,1023.62 243.18,1036.47 212.72,1066.93 153.54,1066.93 125.98,1039.37 125.98,842.52 240.16,728.35 255.91,728.35 271.65,712.6 271.65,692.91 301.18,663.39 310.38,654.18 317.62,654.18 319.92,656.48 327.15,656.48 334.39,649.24 334.39,642 324.06,631.67 324.06,624.43 331.3,617.19 338.54,617.19 339.34,617.99 346.57,617.99 348.25,616.32 401.57,562.99 1169.29,562.99 1456.69,850.39 v1(1519.68,850.39)
DRAM_CKE: U4.D10 U5.K2 | length 2200.5
  L1 (TOP) w4.72: v1(472.44,992.12) U5.K2@488.19,1007.87 ; U4.D10@1535.43,897.64 v1(1551.18,913.38)
  L4 (BOTTOM) w4.72: v1(472.44,992.12) 496.06,968.5 496.06,913.39 535.43,874.02 536.47,874.02 538.83,874.02 543.95,879.13 543.95,879.48 549.07,884.6 559.3,884.6 564.42,879.48 564.42,840.16 569.54,835.04 579.78,835.04 584.89,840.16 584.89,879.48 590.01,884.6 600.25,884.6 605.37,879.48 605.37,840.16 610.48,835.04 620.72,835.04 625.84,840.16 625.84,879.48 630.96,884.6 641.19,884.6 646.31,879.48 646.31,840.16 651.43,835.04 661.67,835.04 666.78,840.16 666.78,879.48 671.9,884.6 682.14,884.6 687.26,879.48 687.26,840.16 692.37,835.04 702.61,835.04 707.73,840.16 707.73,879.48 712.85,884.6 723.08,884.6 728.2,879.48 728.2,840.16 733.32,835.04 743.56,835.04 748.67,840.16 748.67,879.48 753.79,884.6 764.03,884.6 769.15,879.48 769.15,840.16 774.26,835.04 784.5,835.04 789.62,840.16 789.62,879.48 794.74,884.6 804.97,884.6 810.09,879.48 810.09,840.16 815.21,835.04 825.45,835.04 830.56,840.16 830.56,866.56 835.68,871.68 845.92,871.68 851.04,866.56 851.04,847.64 856.15,842.52 865.65,842.52 865.73,842.52 1129.92,842.52 1235.84,948.44 1295.28,948.44 1297.64,948.44 1302.76,953.56 1302.76,983.32 1307.87,988.44 1318.11,988.44 1323.23,983.32 1323.23,932.07 1328.35,926.95 1338.58,926.95 1343.7,932.07 1343.7,983.32 1348.82,988.44 1359.06,988.44 1364.17,983.32 1364.17,932.07 1369.29,926.95 1379.53,926.95 1384.65,932.07 1384.65,983.32 1389.76,988.44 1400,988.44 1405.12,983.32 1405.12,939.09 1410.24,933.97 1420.47,933.97 1425.59,939.09 1425.59,943.32 1430.71,948.44 1447.71,948.44 1516.12,948.44 v1(1551.18,913.38)
DRAM_CLK_N: R22.1 U4.A9 | length 224.3
  L1 (TOP) w4.33: v1(1362.2,870.08) 1364.78,870.08 1371.43,876.73 1389.76,876.73 1430.35,876.73 U4.A9@1440.94,866.14
  L4 (BOTTOM) w4.33: R22.1@1282.11,809.67 1282.11,827.49 1278.75,830.86 1278.75,834.44 1305,860.7 1308.59,860.7 1310.26,859.03 1313.19,859.03 1316.11,861.95 1316.11,864.87 1314.44,866.55 1314.44,870.14 1321.03,876.73 1352.97,876.73 1359.63,870.08 v1(1362.2,870.08)
DRAM_CLK_P: R21.1 U4.A10 | length 224.3
  L1 (TOP) w4.33: v1(1362.2,893.7) 1364.78,893.7 1371.43,887.05 1385.49,887.05 1430.35,887.05 U4.A10@1440.94,897.64
  L4 (BOTTOM) w4.33: R21.1@1246.68,845.11 1264.5,845.11 1267.86,841.74 1271.45,841.74 1316.76,887.05 1352.97,887.05 1359.63,893.7 v1(1362.2,893.7)
DRAM_CLK_R_N: R22.2 U5.K8 | length 1981.7
  L1 (TOP) w4.33: v1(188.98,1031.5) 191.63,1031.5 198.07,1025.06 ; 198.21,1024.84 206.08,1024.84 216.67,1035.43 224.41,1035.43 226.58,1035.43 229.63,1038.48 229.63,1045.65 232.68,1048.7 238.78,1048.7 241.83,1045.65 241.83,1038.48 244.88,1035.43 248.03,1035.43 273.95,1035.43 291.61,1017.77 291.61,1015.14 U5.K8@298.88,1007.87
  L4 (BOTTOM) w4.33: v1(188.98,1031.5) 186.4,1031.5 179.75,1024.84 169.64,1024.84 161.06,1016.26 161.06,907.03 192.58,875.51 255.57,875.51 312.18,818.9 355.83,818.9 383.39,791.34 383.39,681.1 383.39,676.83 409.11,651.1 659.44,651.1 668.9,651.1 682.91,665.12 682.91,678.5 690.89,686.47 706.83,686.47 714.8,678.5 714.8,630 728.82,615.98 753.31,615.98 767.32,630 767.32,678.5 775.3,686.47 791.24,686.47 799.21,678.5 799.21,630 813.23,615.98 837.72,615.98 851.73,630 851.73,678.5 859.7,686.47 875.65,686.47 883.62,678.5 883.62,630 897.64,615.98 922.13,615.98 936.14,630 936.14,677.89 944.11,685.86 960.06,685.86 968.03,677.89 968.03,665.12 982.05,651.1 1001.96,651.1 1095.4,651.1 1212.8,768.5 1216.39,768.5 1219.75,765.13 R22.2@1237.57,765.13
DRAM_CLK_R_P: R21.2 U5.J8 | length 1978.5
  L1 (TOP) w4.33: v1(188.98,1007.87) 191.55,1007.87 198.21,1014.53 210.36,1014.53 220.95,1025.12 269.68,1025.12 281.3,1013.5 281.3,1005.51 299.21,987.6 U5.J8@299.21,976.38
  L4 (BOTTOM) w4.33: v1(188.98,1007.87) 186.4,1007.87 179.75,1014.53 173.92,1014.53 171.38,1011.99 171.38,992.13 171.38,985.46 174.43,982.41 191.83,982.41 194.88,979.36 194.88,973.26 191.83,970.2 174.43,970.2 171.38,967.15 171.38,952.78 171.38,911.3 196.85,885.83 259.84,885.83 316.46,829.21 360.1,829.21 393.7,795.61 393.7,681.1 413.39,661.42 659.44,661.42 664.63,661.42 672.6,669.39 672.6,682.77 686.61,696.79 711.1,696.79 725.12,682.77 725.12,634.27 733.09,626.3 749.04,626.3 757.01,634.27 757.01,682.77 771.02,696.79 795.51,696.79 809.53,682.77 809.53,634.27 817.5,626.3 833.44,626.3 841.42,634.27 841.42,682.77 855.43,696.79 879.92,696.79 893.94,682.77 893.94,634.27 901.91,626.3 917.85,626.3 925.83,634.27 925.83,682.16 939.84,696.18 964.33,696.18 978.35,682.16 978.35,669.39 986.32,661.42 1001.96,661.42 1091.13,661.42 1205.51,775.79 1205.51,779.38 1202.14,782.75 R21.2@1202.14,800.56
DRAM_CS: U4.C5 U5.L8 | length 2200.5
  L1 (TOP) w4.72: v1(283.46,1055.12) U5.L8@299.21,1039.37 ; v1(1488.19,724.41) U4.C5@1503.94,740.16
  L4 (BOTTOM) w4.72: v1(283.46,1055.12) 282.68,1055.91 257.24,1055.91 214.72,1098.43 184.65,1098.43 178.35,1098.43 173.23,1103.54 173.23,1135.63 168.11,1140.75 157.87,1140.75 152.76,1135.63 152.76,1103.54 147.64,1098.43 145.28,1098.43 137.8,1098.43 94.49,1055.12 94.49,779.53 192.91,681.1 216.54,681.1 374.02,523.62 1188.98,523.62 1389.76,724.41 v1(1488.19,724.41)
DRAM_D0: U4.C14 U5.G8 | length 2155.8
  L1 (TOP) w3.54: 1377.95,1051.18 1386.22,1042.91 1484.65,1042.91 U4.C14@1503.94,1023.62
  L1 (TOP) w4.72: U5.G8@299.21,913.39 283.46,929.13 185.04,929.13 114.17,1000 114.17,1240.16 232.28,1358.27 870.08,1358.27 885.83,1342.52 891.73,1342.52 894.09,1342.52 899.21,1347.64 899.21,1356.82 904.33,1361.94 914.57,1361.94 919.69,1356.82 919.69,1340.16 924.8,1335.04 935.04,1335.04 940.16,1340.16 940.16,1356.82 945.28,1361.94 955.51,1361.94 960.63,1356.82 960.63,1340.16 965.75,1335.04 975.98,1335.04 981.1,1340.16 981.1,1356.82 986.22,1361.94 996.46,1361.94 1001.57,1356.82 1001.57,1347.64 1006.69,1342.52 1041.34,1342.52 1078.74,1342.52 1338.58,1082.68 1338.58,1070.87 1358.27,1051.18 1377.95,1051.18
DRAM_D1: U4.B13 U5.G2 | length 2146.7
  L1 (TOP) w3.54: 1377.95,980.31 1378.35,979.92 1446,979.92 1446.79,980.71 1461.02,980.71 U4.B13@1472.44,992.13
  L1 (TOP) w4.72: U5.G2@488.19,913.39 506.89,894.69 551.18,894.69 565.94,909.45 586.61,909.45 588.98,909.45 594.1,914.57 594.1,931.62 599.21,936.73 609.45,936.73 614.57,931.62 614.57,903.15 619.69,898.03 629.92,898.03 635.04,903.15 635.04,937.75 640.16,942.87 650.39,942.87 655.51,937.75 655.51,903.15 660.63,898.03 670.87,898.03 675.98,903.15 675.98,937.75 681.1,942.87 691.34,942.87 696.46,937.75 696.46,914.57 701.58,909.45 716.54,909.45 720.47,909.45 724.41,913.39 726.08,915.06 726.08,922.29 701.32,947.06 701.32,954.29 708.56,961.53 715.8,961.53 761.38,915.95 768.62,915.95 775.85,923.19 775.85,930.43 730.27,976.01 730.27,983.25 737.51,990.48 744.75,990.48 790.33,944.9 797.57,944.9 804.81,952.14 804.81,959.38 759.22,1004.96 759.22,1012.2 766.46,1019.44 773.7,1019.44 798.46,994.68 805.7,994.68 816.93,1005.9 842.85,1031.83 842.52,1032.16 842.52,1062.99 849.48,1069.95 850.39,1070.87 872.31,1070.87 877.43,1065.75 877.43,1042.24 882.55,1037.12 892.79,1037.12 897.9,1042.24 897.9,1067.54 903.02,1072.66 913.26,1072.66 918.38,1067.54 918.38,1042.24 923.49,1037.12 933.73,1037.12 938.85,1042.24 938.85,1067.54 943.97,1072.66 954.2,1072.66 959.32,1067.54 959.32,1042.24 964.44,1037.12 974.68,1037.12 979.79,1042.24 979.79,1067.54 984.91,1072.66 995.15,1072.66 1000.27,1067.54 1000.27,1042.24 1005.38,1037.12 1015.62,1037.12 1020.74,1042.24 1020.74,1067.54 1025.86,1072.66 1036.09,1072.66 1041.21,1067.54 1041.21,1042.24 1046.33,1037.12 1056.56,1037.12 1061.68,1042.24 1061.68,1067.54 1066.8,1072.66 1077.04,1072.66 1082.16,1067.54 1082.16,1042.24 1087.27,1037.12 1097.51,1037.12 1102.63,1042.24 1102.63,1067.54 1107.75,1072.66 1117.98,1072.66 1123.1,1067.54 1123.1,1042.24 1128.22,1037.12 1138.45,1037.12 1143.57,1042.24 1143.57,1067.54 1148.69,1072.66 1158.93,1072.66 1164.04,1067.54 1164.04,1042.24 1169.16,1037.12 1179.4,1037.12 1184.52,1042.24 1184.52,1065.75 1189.64,1070.87 1196.66,1070.87 1204.72,1070.87 1294.88,980.71 1377.56,980.71 1377.95,980.31
DRAM_D2: U4.A14 U5.H7 | length 2151.6
  L1 (TOP) w4.72: U5.H7@330.71,944.88 354.33,944.88 377.95,968.5 377.95,1192.91 393.7,1208.66 393.7,1279.53 429.13,1314.96 744.09,1314.96 763.78,1295.28 766.14,1292.91 773.38,1292.91 778.5,1298.03 778.5,1307.19 783.62,1312.31 793.85,1312.31 798.97,1307.19 798.97,1264.78 804.09,1259.66 814.33,1259.66 819.44,1264.78 819.44,1307.19 824.56,1312.31 834.8,1312.31 839.92,1307.19 839.92,1264.78 845.03,1259.66 855.27,1259.66 860.39,1264.78 860.39,1307.19 865.51,1312.31 875.74,1312.31 880.86,1307.19 880.86,1264.78 885.98,1259.66 896.21,1259.66 901.33,1264.78 901.33,1307.19 906.45,1312.31 916.69,1312.31 921.81,1307.19 921.81,1264.78 926.92,1259.66 937.16,1259.66 942.28,1264.78 942.28,1307.19 947.4,1312.31 957.63,1312.31 962.75,1307.19 962.75,1264.78 967.87,1259.66 978.1,1259.66 983.22,1264.78 983.22,1307.19 988.34,1312.31 998.58,1312.31 1003.69,1307.19 1003.69,1264.78 1008.81,1259.66 1019.05,1259.66 1024.17,1264.78 1024.17,1307.19 1029.29,1312.31 1039.52,1312.31 1044.64,1307.19 1044.64,1284.65 1049.76,1279.53 1075.06,1279.53 1094.49,1279.53 1346.46,1027.56 1377.95,1027.56 1381.89,1023.62 U4.A14@1440.94,1023.62
DRAM_D3: U4.A13 U5.H3 | length 2156.6
  L1 (TOP) w4.72: U5.H3@456.69,944.88 458.43,943.15 470.43,943.15 484.45,929.13 574.8,929.13 598.43,952.76 685.04,952.76 775.59,1043.31 791.34,1043.31 842.52,1094.49 842.52,1110.24 846.46,1114.17 848.58,1114.17 850.94,1114.17 856.06,1119.29 856.06,1157.2 861.18,1162.32 871.41,1162.32 876.53,1157.2 876.53,1087.48 881.65,1082.36 891.88,1082.36 897,1087.48 897,1157.2 902.12,1162.32 912.36,1162.32 917.47,1157.2 917.47,1087.48 922.59,1082.36 932.83,1082.36 937.95,1087.48 937.95,1157.2 943.07,1162.32 953.3,1162.32 958.42,1157.2 958.42,1087.48 963.54,1082.36 973.77,1082.36 978.89,1087.48 978.89,1157.2 984.01,1162.32 994.25,1162.32 999.36,1157.2 999.36,1087.48 1004.48,1082.36 1014.72,1082.36 1019.84,1087.48 1019.84,1157.2 1024.95,1162.32 1035.19,1162.32 1040.31,1157.2 1040.31,1087.48 1045.43,1082.36 1055.66,1082.36 1060.78,1087.48 1060.78,1157.2 1065.9,1162.32 1076.14,1162.32 1081.25,1157.2 1081.25,1087.48 1086.37,1082.36 1096.61,1082.36 1101.73,1087.48 1101.73,1157.2 1106.84,1162.32 1117.08,1162.32 1122.2,1157.2 1122.2,1087.48 1127.32,1082.36 1137.55,1082.36 1142.67,1087.48 1142.67,1109.06 1147.79,1114.17 1153.86,1114.17 1185.04,1114.17 1307.09,992.13 U4.A13@1440.94,992.13
DRAM_D4: U4.C13 U5.H1 | length 2141.2
  L1 (TOP) w3.54: 1377.95,1003.94 1427.53,1003.94 1427.92,1004.33 1477.5,1004.33 1489.7,992.13 U4.C13@1503.94,992.13
  L1 (TOP) w4.72: U5.H1@519.69,944.88 551.18,944.88 590.55,984.25 590.55,1011.81 610.24,1031.5 736.22,1031.5 742.13,1037.4 743.8,1039.07 743.8,1046.31 728.46,1061.65 728.46,1068.89 735.7,1076.12 742.94,1076.12 758.27,1060.79 765.51,1060.79 779.53,1074.8 783.46,1078.74 783.46,1083.52 783.47,1085.89 783.48,1106.36 788.59,1111.48 823.59,1111.48 828.71,1116.6 828.71,1126.83 823.59,1131.95 787.25,1131.95 782.14,1137.07 782.14,1147.3 787.25,1152.42 823.59,1152.42 828.71,1157.54 828.71,1167.78 823.59,1172.89 787.25,1172.89 782.14,1178.01 782.14,1188.25 787.25,1193.37 823.59,1193.37 828.71,1198.49 828.71,1208.72 823.59,1213.84 788.65,1213.84 783.53,1218.96 783.53,1222.12 783.54,1224.48 791.34,1232.28 849.86,1232.28 872.69,1232.28 877.81,1227.17 877.81,1177.27 882.93,1172.15 893.16,1172.15 898.28,1177.27 898.28,1227.48 903.4,1232.6 913.64,1232.6 918.75,1227.48 918.75,1177.27 923.87,1172.15 934.11,1172.15 939.23,1177.27 939.23,1227.48 944.34,1232.6 954.58,1232.6 959.7,1227.48 959.7,1177.27 964.82,1172.15 975.05,1172.15 980.17,1177.27 980.17,1227.48 985.29,1232.6 995.52,1232.6 1000.64,1227.48 1000.64,1177.27 1005.76,1172.15 1016,1172.15 1021.12,1177.27 1021.12,1227.48 1026.23,1232.6 1036.47,1232.6 1041.59,1227.48 1041.59,1177.27 1046.71,1172.15 1056.94,1172.15 1062.06,1177.27 1062.06,1227.17 1067.18,1232.28 1090.55,1232.28 1319.29,1003.54 1377.95,1003.54